# Altium PCB PCB1.PcbDoc (part 2 of 2)
Units mm, origin at the board's own origin, x right, y up, seen from the top; angles counter-clockwise.
Board outline 153 x 70 mm, 4 copper layers (Top Layer, Middle Layer 1, Middle Layer 2, Bottom Layer), stack 0.417 mm thick; 107 components, 120 nets, 560 pads, 392 vias.
Unrouted connection lines stored in the file: 47.
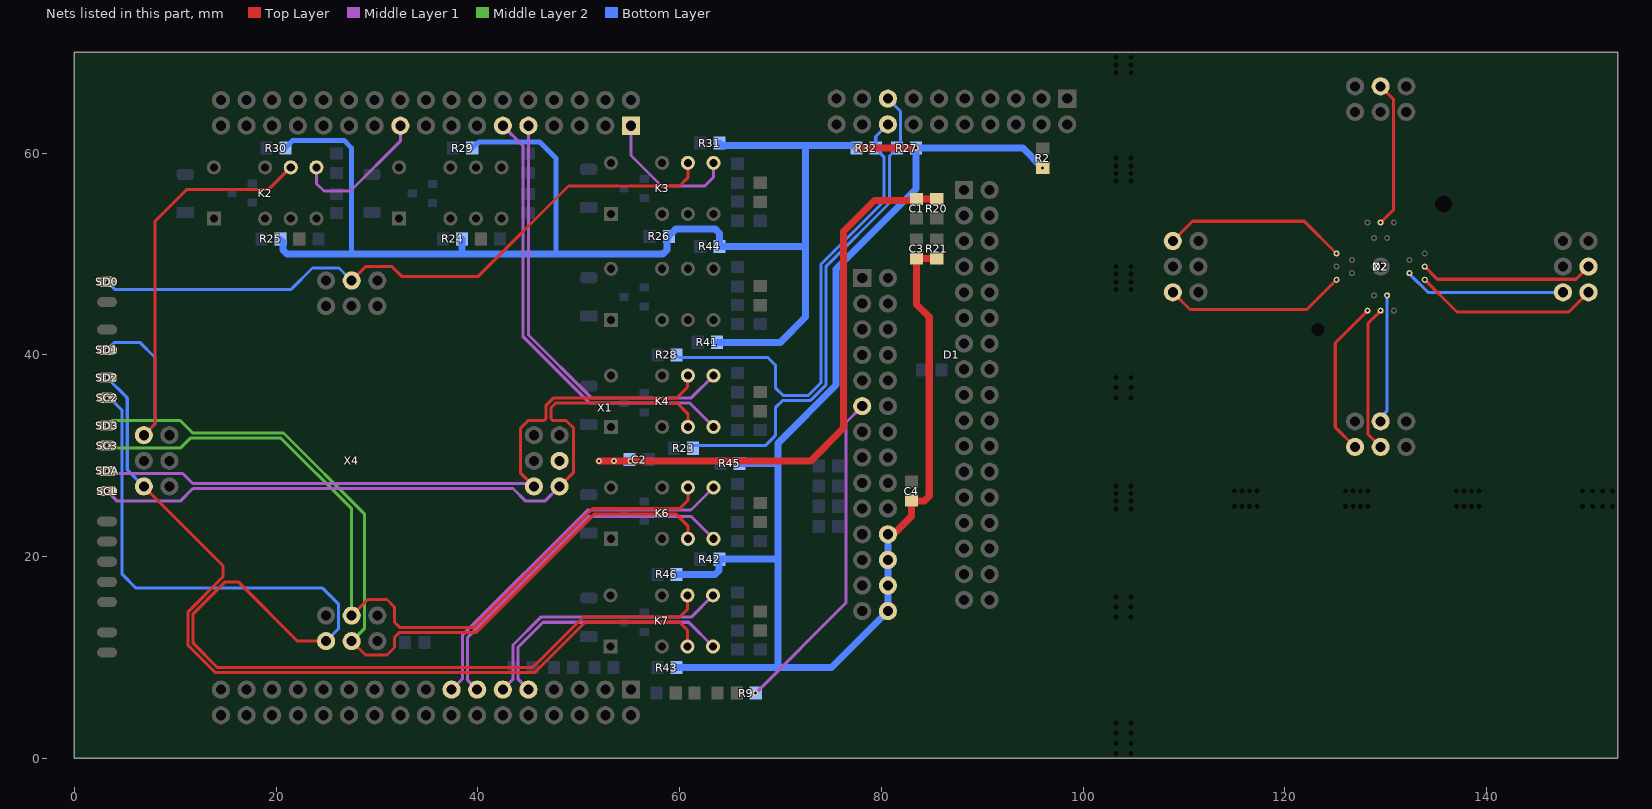
[diagram p4: the nets of this part, all layers, seen from the top]

## Via types
v1: diameter 0.6, hole 0.3, Top Layer to Bottom Layer, tented both sides, 392 vias

## Nets (pads, with @x,y where several pads share a name; then routed paths per layer and width w, separated by ;. In a path a pad name is that pad's centre, name@x,y a point inside that pad or via, vN(x,y) a via of type N, cw(c..) or ccw(c..) an arc to the next point about the centre after c; other vN are vias at no path point) (continued)
SC2_F: K7.8 X1.60 | length 26.7
  Middle Layer 1 w0.3: X1.60@42.48,6.82 43.5,7.84 43.5,11.25 46.25,14 61.15,14 K7.8@63.32,16.17
SC2_KY: D2.11 X2.11 | length 15.6
  Top Layer w0.3: X2.11@126.96,30.875 125,32.835 125,41.18 D2.11@128.2,44.38
SC2_PCA: K7.9 SC2.1 X4.11 | length 118.8
  Top Layer w0.3: X4.11@24.96,11.625 22.125,11.625 16.25,17.5 14.957,17.5 11.75,14.293 11.75,11.457 14.207,9 45.422,9 50.422,14 50.75,14 60,14 60.78,14.78 K7.9@60.78,16.17
  Bottom Layer w0.3: v1(3.25,35.75) 3.307,35.693 3.557,35.693 4.75,34.5 4.75,18.25 6.126,16.874 24.626,16.874 26.21,15.29 26.21,12.875 X4.11@24.96,11.625
SC3_F: K6.8 X1.58 | length 36.8
  Middle Layer 1 w0.3: X1.58@37.4,6.82 38.5,7.92 38.5,12.25 50.882,24.632 61.137,24.632 K6.8@63.36,26.855
SC3_KY: D2.14 X2.14 | length 12.8
  Bottom Layer w0.3: X2.14@129.5,33.415 129.5,33.821 130.15,34.471 D2.14@130.15,45.905
SC3_PCA: K6.9 SC3.1 X4.14 | length 80.7
  Top Layer w0.3: X4.14@27.5,14.165 29.085,15.75 31,15.75 31.75,15 31.75,13.5 32.25,13 39.628,13 51.378,24.75 59.995,24.75 60.82,25.575 K6.9@60.82,26.855
  Middle Layer 2 w0.3: v1(3.25,31) 3.326,31 3.576,30.75 10.5,30.75 11.5,31.75 20.5,31.75 27.5,24.75 X4.14@27.5,14.165
SCL_F: K4.5 X1.6 | length 44.3
  Middle Layer 1 w0.3: X1.6@42.48,62.72 44.5,60.7 44.5,41.793 51.043,35.25 60.978,35.25 K4.5@63.36,32.868
SCL_KY: D2.16 X2.16 | length 18.4
  Top Layer w0.3: D2.16@133.87,47.45 137.07,44.25 148.145,44.25 X2.16@150.105,46.21
SCL_MC: D1.15X2 R23.2 R27.1 | length 49.2
  Bottom Layer w0.3: R23.2@61.348,31 68.5,31 69.5,32 69.5,34.75 70.25,35.5 73,35.5 74.5,37 74.5,48.75 80.811,55.061 80.811,59.711 81.55,60.45 R27.1@81.55,60.5 81.9,60.85 81.9,64.15 D1.15X2@80.65,65.4
SCL_PCA: K4.4 SCL.1 X4.16 | length 72.5
  Top Layer w0.3: X4.16@48.105,26.96 49.5,28.355 49.5,32.75 48.75,33.5 47.426,33.5 47.25,33.676 47.25,34.75 47.75,35.25 59.75,35.25 60.82,34.18 K4.4@60.82,32.868
  Middle Layer 1 w0.3: v1(3.25,26.5) 4.25,25.5 10.5,25.5 11.75,26.75 43.5,26.75 44.75,25.5 46.645,25.5 X4.16@48.105,26.96
SD0_F: K3.8 X1.1 | length 14.2
  Middle Layer 1 w0.3: X1.1@55.18,62.72 55.18,59.777 58.207,56.75 62.5,56.75 63.36,57.61 K3.8@63.36,59.04
SD0_KY: D2.3 X2.3 | length 14.5
  Top Layer w0.3: D2.3@129.5,53.12 130.75,54.37 130.75,65.375 X2.3@129.5,66.625
SD0_PCA: K3.9 SD0.1 X4.3 | length 65.8
  Top Layer w0.3: X4.3@27.5,47.375 28.875,48.75 31.5,48.75 32.5,47.75 40,47.75 49,56.75 60,56.75 60.82,57.57 K3.9@60.82,59.04
  Bottom Layer w0.3: v1(3.25,47.25) 4,46.5 21.5,46.5 23.625,48.625 26.25,48.625 X4.3@27.5,47.375
SD1_F: K2.8 X1.10 | length 13.8
  Middle Layer 1 w0.3: K2.8@24,58.59 24,57 24.75,56.25 27.388,56.25 32.32,61.182 X1.10@32.32,62.72
SD1_KY: D2.6 X2.6 | length 18.4
  Top Layer w0.3: X2.6@108.895,51.29 110.855,53.25 121.93,53.25 D2.6@125.13,50.05
SD1_PCA: K2.9 SD1.1 X4.6 | length 51.2
  Top Layer w0.3: X4.6@6.895,32.04 8,33.145 8,53.25 11.168,56.418 19.288,56.418 K2.9@21.46,58.59
  Bottom Layer w0.3: v1(3.25,40.5) 4,41.25 6.5,41.25 8,39.75 8,33.145 X4.6@6.895,32.04
SD2_F: K7.5 X1.61 | length 26
  Middle Layer 1 w0.3: X1.61@45.02,6.82 44,7.84 44,11.043 46.457,13.5 60.91,13.5 K7.5@63.32,11.09
SD2_KY: D2.10 X2.10 | length 18.2
  Top Layer w0.3: X2.10@108.895,46.21 110.605,44.5 122.18,44.5 D2.10@125.13,47.45
SD2_PCA: K7.4 SD2.1 X4.10 | length 87.4
  Top Layer w0.3: X4.10@6.895,26.96 14.75,19.105 14.75,18 11.25,14.5 11.25,11.25 14,8.5 45.63,8.5 50.63,13.5 60,13.5 60.78,12.72 K7.4@60.78,11.09
  Bottom Layer w0.3: v1(3.25,37.75) 5.25,35.75 5.25,28.605 X4.10@6.895,26.96
SD3_F: K6.5 X1.59 | length 35.8
  Middle Layer 1 w0.3: X1.59@39.94,6.82 39,7.76 39,12 51,24 61.135,24 K6.5@63.36,21.775
SD3_KY: D2.13 X2.13 | length 14.5
  Top Layer w0.3: X2.13@129.5,30.875 128.25,32.125 128.25,43.13 D2.13@129.5,44.38
SD3_PCA: K6.4 SD3.1 X4.13 | length 84.8
  Top Layer w0.3: X4.13@27.5,11.625 28.875,10.25 31,10.25 31.75,11 31.75,12 32.25,12.5 39.835,12.5 51.585,24.25 59.625,24.25 60.82,23.055 K6.4@60.82,21.775
  Middle Layer 2 w0.3: v1(3.25,33) 3.75,33.5 10.5,33.5 11.75,32.25 20.75,32.25 28.79,24.21 28.79,12.915 X4.13@27.5,11.625
SDA_F: K4.8 X1.5 | length 42.6
  Middle Layer 1 w0.3: X1.5@45.02,62.72 45.02,41.98 51.25,35.75 61.163,35.75 K4.8@63.36,37.948
SDA_KY: D2.17 X2.17 | length 16
  Bottom Layer w0.3: D2.17@132.345,48.1 132.345,48.056 134.191,46.21 X2.17@147.565,46.21
SDA_MC: D1.16X2 R28.2 R32.1 | length 46.8
  Bottom Layer w0.3: R28.2@59.7,40 59.95,39.75 68.75,39.75 69.5,39 69.5,36.75 70.25,36 72.793,36 74,37.207 74,48.957 80.25,55.207 80.25,59.65 79.45,60.45 R32.1@79.45,60.5 79.45,61.66 D1.16X2@80.65,62.86
SDA_PCA: K4.9 SDA.1 X4.17 | length 69.4
  Top Layer w0.3: X4.17@45.565,26.96 44.25,28.275 44.25,32.75 45,33.5 46.574,33.5 46.75,33.676 46.75,34.75 46.75,34.957 47.543,35.75 59.75,35.75 60.797,36.798 60.797,37.925 K4.9@60.82,37.948
  Middle Layer 1 w0.3: v1(3.25,28.5) 3.326,28.5 3.576,28.25 10.75,28.25 11.75,27.25 44.639,27.25 44.642,27.247 45.278,27.247 X4.17@45.565,26.96
VCC_MC: C3.1 C4.1 D1.22X3 D1.24X3 D1.26X3 D1.28X3 R2.2 R21.2 R24.2 R25.2 R26.2 R27.2 R29.2 R30.2 R31.2 R32.2 R41.2 R42.2 R43.2 R44.2 R45.2 R46.2 | length 289.5
  Top Layer w0.7: v1(77.55,60.5) v1(83.45,60.5) ; D1.22X3@80.65,22.22 80.86,22.43 81.43,22.43 83,24 C4.1@83,25.55 83.01,25.54 84.29,25.54 84.75,26 84.75,43.75 83.5,45 C3.1@83.5,49.55 R21.2@85.5,49.55
  Bottom Layer w0.5: R30.2@20.95,60.5 20.95,60.55 21.65,61.25 26.75,61.25 27.5,60.5 27.5,50 ; R29.2@39.45,60.5 39.45,60.55 39.7,60.8 39.81,60.8 40.11,61.1 46.15,61.1 47.75,59.5 47.75,50.09
  Bottom Layer w0.7: R25.2@20.45,51.45 20.7,51.2 20.7,50.41 21.11,50 27.5,50 38.45,50 ; R24.2@38.45,51.5 38.45,50 ; R26.2@58.95,51.75 58.75,51.55 58.75,50.41 58.34,50 38.45,50 ; R26.2@59.2,52.05 59.65,52.5 63.5,52.5 63.96,52.04 63.96,50.76 R44.2@63.95,50.75 72.5,50.75 ; R43.2@59.7,9 69.75,9 ; R46.2@59.7,18.25 63.5,18.25 63.893,18.643 63.893,19.75 R42.2@63.95,19.75 69.75,19.75 ; R41.2@63.7,41.25 70,41.25 72.5,43.75 72.5,50.75 ; R31.2@63.95,61 64.2,60.75 72.5,60.75 ; R45.2@65.95,29.25 69.75,29.25 ; v1(77.55,60.5) 77.505,60.545 ccw(c77.01,60.05) 77.01,60.75 72.5,60.75 ; D1.22X3@80.65,22.22 D1.24X3@80.65,19.68 D1.26X3@80.65,17.14 D1.28X3@80.65,14.6 75.05,9 69.75,9 ; v1(96,58.55) 94.05,60.5 v1(83.45,60.5) 83.45,56.45 75.5,48.5 75.5,37 69.75,31.25 69.75,29.25 ; 69.75,9 69.75,19.75 ; 69.75,19.75 69.75,29.25 ; 72.5,50.75 72.5,60.75
VDD_KY: D2.18 X2.18 | length 17.3
  Top Layer w0.3: D2.18@133.87,48.754 135.124,47.5 148.855,47.5 X2.18@150.105,48.75
VDD_PCA: C1.1 C2.1 R20.2 X4.18 | length 55.6
  Top Layer w0.7: v1(52,29.5) v1(53.5,29.5) 55,29.5 73,29.5 76.25,32.75 76.25,52.25 79.308,55.308 83.308,55.308 C1.1@83.45,55.45 ; C1.1@83.5,55.45 R20.2@85.5,55.45
  other v1: 55.154,29.498
WRITE: D1.11X3 R9.1 | length 32.8
  Middle Layer 1 w0.3: v1(67.55,6.47) 76.5,15.42 76.5,33.31 D1.11X3@78.11,34.92
pads on no net: D1.1X3 D1.2X3 D1.3X3 D1.4X3 D1.6X2 D1.6X3 D1.7X3 D1.8X2 D1.8X3 D1.9X2 D1.10X2 D1.10X3 D1.11X2 D1.12X2 D1.12X3 D1.13X2 D1.13X3 D1.14X2 D1.14X3 D1.15X3 D1.16X3 D1.17X2 D1.18X2 D1.19X2 D1.20X2 D2.0 X1.11 X1.12 X1.13 X1.14 X1.15 X1.16 X1.17 X1.18 X1.19 X1.20 X1.21 X1.22 X1.23 X1.24 X1.25 X1.26 X1.27 X1.28 X1.29 X1.30 X1.31 X1.32 X1.33 X1.34 X1.35 X1.36 X1.37 X1.38 X1.39 X1.40 X1.41 X1.42 X1.43 X1.44 X1.45 X1.46 X1.47 X1.48 X1.49 X1.50 X1.51 X1.52 X1.53 X1.54 X1.55 X1.56 X1.57 X1.+12V X1.-12V X1.IN-OUT2 X1.IN-OUT3 X1.IN-OUT4 X1.IN-OUT5 X1.IN-OUT6 X1.IN-OUT7 X1.IN-OUT8 X1.NC X1.OUT4 X1.OUT5 X1.OUT6 X1.OUT7 X1.OUT8 X1.VDDF X1.VDDS X1.VEEF X1.VEES

## Polygon pours and split planes (outlines as drawn)
EP_KY on Top Layer "NONET_L-01_P-001" (solid, remove dead copper, pour order 0): 107,68.75 107,28.75 152,28.75 152,68.75
GND on Top Layer "NONET_L-01_P-001" (solid, remove dead copper, pour order 2): 1,69 101,69 101,1 1,1
VDD_PCA on Bottom Layer "NONET_L-01_P-001" (solid, remove dead copper, pour order 1): 47.75,31.25 55.5,31.25 56,30.75 56,28.5 55.5,28 49.214,28 47.25,28 47.25,30.75
GND on Bottom Layer "NONET_L-01_P-001" (solid, remove dead copper, pour order 8): 1,69 1,1 101,1 101,69
EP_KY on Bottom Layer "NONET_L-01_P-001" (solid, remove dead copper, pour order 5): 107,68.75 107,28.75 152,28.75 152,68.75
EP_KY on Middle Layer 1 "NONET_L-01_P-001" (solid, remove dead copper, pour order 6): 107,68.75 107,28.75 152,28.75 152,68.75
GND on Middle Layer 1 "NONET_L-01_P-001" (solid, remove dead copper, pour order 3): 1,69 1,1 101,1 101,69
EP_KY on Middle Layer 2 "NONET_L-01_P-001" (solid, remove dead copper, pour order 7): 107,68.75 107,28.75 152,28.75 152,68.75
GND on Middle Layer 2 "NONET_L-01_P-001" (solid, remove dead copper, pour order 4): 1,69 1,1 101,1 101,69

## Other copper
Top Layer:
  pour cut-out: 68.85,45.72 68.85,42.49 67.553,42.49
  pour cut-out: 67.793,45.72 65.525,45.72 65.525,45.029
  pour cut-out: 5.809,29.661 5.061,29.661 5.061,30.034
  pour cut-out: 133.149,30.875 133.149,32.698 134.33,32.698
  pour cut-out: 125.851,30.875 125.851,32.698 124.67,32.698
  pour cut-out: 128.5,36.5 128.5,32.335 134,32.335 134,34.75
  pour cut-out: 126.96,29.766 132.04,29.766 132.04,30.875
  pour cut-out: 130.66,45.905 130.66,44.376 131.309,44.376
  pour cut-out: 128.34,45.905 128.34,44.376 127.691,44.376
  pour cut-out: 128.85,46.415 130.15,46.415 130.15,45.905
  pour cut-out: 150.105,45.101 148.282,45.101 148.282,43.92
  pour cut-out: 150.105,52.399 148.397,52.399 148.397,53.502
  pour cut-out: 144.75,53.25 148.5,53.25 148.5,49.75 145,49.75
  pour cut-out: 151.214,51.29 151.214,46.21 150.105,46.21
  pour cut-out: 131.835,49.4 131.835,48.078 132.345,48.078
  pour cut-out: 132.345,47.59 133.87,47.59 133.87,46.94
  pour cut-out: 132.345,49.91 133.874,49.91 133.874,50.559
  pour cut-out: 130.66,51.595 130.66,53.12 131.31,53.12
  pour cut-out: 128.85,51.085 130.172,51.085 130.172,51.595
  pour cut-out: 127.84,52.76 128.379,52.76 128.379,51.4
  pour cut-out: 125.415,65.221 125,62.75 130.75,62.75 130.75,65.375
  pour cut-out: 126.96,67.734 132.04,67.734 132.04,66.625
  pour cut-out: 108.895,45.101 110.468,45.101 110.468,44.17
  pour cut-out: 108.895,52.399 110.603,52.399 110.603,53.502
  pour cut-out: 109.75,50 113.25,50 113.25,44.75 110.355,44.75
  pour cut-out: 127.031,47.75 125.126,47.75 125.126,46.941
  pour cut-out: 127.165,49.4 127.165,48.1 126.655,48.1
  pour cut-out: 125.13,50.56 125.13,49.75 127.03,49.75
  pour cut-out: 111.435,47.641 108.895,47.641 108.895,48.75
  pour cut-out: 110.004,46.21 110.004,48.75 108.895,48.75
  pour cut-out: 112.544,48.75 112.544,50 111.75,50
  pour cut-out: 107.786,51.29 107.786,46.21 108.895,46.21
  pour cut-out: 90.74,54.929 85.5,54.929 85.5,53.55
  pour cut-out: 7.975,29.649 9.432,29.649 9.432,30.772
  pour cut-out: 9.435,33.149 5.786,33.149 5.786,30.75 10.544,30.75 10.544,32.04
  pour cut-out: 24.96,15.274 31.75,15.274 31.75,10.516 24.96,10.516
  pour cut-out: 23.97,14.65 23.97,11.982 22.273,11.982
  pour cut-out: 84.65,52.25 86.35,52.25 86.35,48.75 84.65,48.75
  pour cut-out: 84.65,52.75 86.35,52.75 86.35,56.25 84.65,56.25
  pour cut-out: 95.15,59.65 95.15,59.35 96.85,59.35 96.85,59.65
  pour cut-out: 86.35,54.107 86.35,51.28 91.812,51.28 91.812,54.107
  pour cut-out: 87.091,45.267 83.5,45.267 83.5,44.75
  pour cut-out: 88.2,47.309 90.74,47.309 90.74,46.2
  pour cut-out: 91.849,46.2 91.849,43.66 90.74,43.66
  pour cut-out: 88.2,19.691 85.5,19.691 85.5,20.5
  pour cut-out: 91.849,43.66 91.849,19.75 87.091,19.75 87.091,44.93
  pour cut-out: 87.091,46.2 87.091,43.66 88.2,43.66
  pour cut-out: 80.65,25.869 82.911,25.869 82.911,25.461
  pour cut-out: 77.001,24.76 77.001,22.22 78.11,22.22
  pour cut-out: 78.11,25.869 80.65,25.869 80.65,24.76
  pour cut-out: 82.142,15.638 80.65,15.638 80.65,14.6
  pour cut-out: 79.207,14.757 80.699,14.757 80.699,15.28
  pour cut-out: 77.001,22.22 77.001,17.14 78.11,17.14
  pour cut-out: 45.565,25.851 48.105,25.851 48.105,26.96
  pour cut-out: 45,33.5 48.105,33.5 48.105,26.96 45.565,26.96
  pour cut-out: 72.89,33.301 72.89,32.585 71.228,32.585
  pour cut-out: 74.496,34.509 76.25,34.509 76.25,33.75
  pour cut-out: 70.303,30.687 70.303,29.5 70.813,29.5
  pour cut-out: 31.112,44.548 31.112,46.893 32.648,46.893
  pour cut-out: 28.592,42.92 30.04,42.92 30.04,44.835
  pour cut-out: 28.875,48.75 26.25,48.75 26.25,48.25
  pour cut-out: 25.109,45.854 25.109,47.5 25.828,47.5
Middle Layer 1:
  pour cut-out: 39.357,7.908 45.02,7.908 45.02,6.82
  pour cut-out: 39.94,5.711 42.48,5.711 42.48,6.82
  pour cut-out: 53.2,58.132 56,58.132 56,59
  pour cut-out: 52.296,59.04 52.296,62.25 53,62.25
  pour cut-out: 5.75,30.75 8,30.75 8,28.25 5.75,28.25
  pour cut-out: 95.89,63.969 93.35,63.969 93.35,61.751 93.328,60.252
  pour cut-out: 50.1,63.829 52.64,63.829 52.704,61.546 49.028,61.546
  pour cut-out: 45.02,63.829 47.56,63.829 47.56,62.72
  pour cut-out: 48.143,61.632 45.377,61.677 45.02,62.72
  pour cut-out: 32.2,57.682 38.679,57.682 37.4,63.829 34.86,63.829
  pour cut-out: 132.345,47.59 133.87,46.94 134.38,47.45 134.38,50.05 133.87,50.56 132.345,49.91 131.835,49.4 131.835,48.1
  pour cut-out: 128.85,46.415 130.15,46.415 130.66,45.905 131.271,44.575 131.31,44.38 130.8,43.87 128.2,43.87 127.729,44.575 128.379,46.1
  pour cut-out: 125.13,50.56 126.655,49.91 127.165,49.4 127.165,48.1 126.655,47.59 125.13,46.94 124.62,47.45 124.62,50.05
  pour cut-out: 127.69,53.12 128.34,51.595 128.85,51.085 130.15,51.085 130.66,51.595 131.31,53.12 130.8,53.63 128.2,53.63
  pour cut-out: 4.25,25.143 1.75,25.143 1.75,28.75
  pour cut-out: 10.544,32.04 10.544,29.5 9.435,29.5
  pour cut-out: 6.895,33.149 9.435,33.149 9.435,32.04
  pour cut-out: 5.613,31.08 6.895,31.08 6.895,32.04
  pour cut-out: 32.2,57.682 29.854,57.682 29.854,58.716
  pour cut-out: 33.108,58.59 33.108,62.72 32.32,62.72
  pour cut-out: 32.32,63.829 34.86,63.829 34.86,62.72
  pour cut-out: 36.291,62.72 36.291,58.59 37.28,58.59
  pour cut-out: 42.36,52.602 44.75,52.602 44.75,54.25
  pour cut-out: 37.4,63.829 39.94,63.829 39.94,62.72
  pour cut-out: 39.94,63.829 42.48,63.829 42.48,62.72
  pour cut-out: 42.48,63.829 45.02,63.829 45.02,62.72
  pour cut-out: 47.56,63.829 50.1,63.829 50.1,62.72
  pour cut-out: 52.64,63.829 55.18,63.829 55.18,62.72
  pour cut-out: 45.565,28.069 48.105,28.069 48.105,26.96
  pour cut-out: 37.4,5.711 39.94,5.711 39.94,6.82
  pour cut-out: 42.48,5.711 45.02,5.711 45.02,6.82
  pour cut-out: 67.04,6.47 67.04,7.75 67.5,7.75
  pour cut-out: 79.219,37.46 79.219,34.92 78.11,34.92
Middle Layer 2:
  pour cut-out: 88.2,19.369 90.74,19.369 90.74,18.26
  pour cut-out: 3.25,44.74 2,44.74 2,45.25
  pour cut-out: 3.76,45.25 3.76,46.25 3,46.25
  pour cut-out: 54.06,11.99 54.06,9 53,9
  pour cut-out: 55.154,30.008 51,30.008 51,28.988 55.154,28.988
  pour cut-out: 7.989,29.654 9.382,29.654 9.382,32.067
  pour cut-out: 28.79,10.018 29.868,10.447 29.868,13.124 24.96,15.274 23.851,14.165 23.851,11.625 23.851,10.271
  pour cut-out: 24.96,15.274 29.844,15.312 29.844,13.049
  pour cut-out: 125.13,50.56 126.655,49.91 127.165,49.4 127.165,48.1 126.655,47.59 125.13,46.94 124.62,47.45 124.62,50.05
  pour cut-out: 128.85,46.415 130.15,46.415 130.66,45.905 131.31,44.38 130.8,43.87 128.2,43.87 127.69,44.38 128.34,45.905
  pour cut-out: 132.345,49.91 133.87,50.56 134.38,50.05 134.38,47.45 133.87,46.94 132.345,47.59 131.835,48.1 131.835,49.4
  pour cut-out: 128.2,53.63 130.8,53.63 131.31,53.12 130.66,51.595 130.15,51.085 128.85,51.085 128.34,51.595 127.69,53.12
  pour cut-out: 88.2,14.611 85,14.611 85,15.5
  pour cut-out: 90.74,14.611 88.2,14.611 88.2,15.72
  pour cut-out: 91.849,18.26 91.849,15.72 90.74,15.72
  pour cut-out: 2.74,33 2.74,31 3.25,31
Bottom Layer:
  pour cut-out: 64.268,26.855 64.268,29.5 62.75,29.5
  pour cut-out: 42.84,52.233 44.25,52.233 44.25,53.328
  pour cut-out: 59.148,11.09 59.148,9 57.8,9
  pour cut-out: 88.2,39.689 83.25,39.689 83.25,37.471
  pour cut-out: 88.2,37.471 83.25,37.471 83.25,39.35
  pour cut-out: 81.759,22.22 81.759,14.6 80.65,14.6
  pour cut-out: 57.372,48.54 57.372,50 58.34,50
  pour cut-out: 58.648,31.6 58.648,32.868 57.372,32.868
  pour cut-out: 59.148,16.17 59.148,18.25 57.8,18.25
  pour cut-out: 60,30.625 60,28.875 61.782,28.875
  pour cut-out: 26.164,60.515 26.164,58.765 26.914,58.765
  pour cut-out: 69.143,36.75 69.143,34.75 69.5,34.75
  pour cut-out: 64.9,37.1 66.581,37.1 66.581,32.234
  pour cut-out: 63.36,22.683 65.75,22.683 65.75,21.55
  pour cut-out: 68.689,24.25 65.75,24.25 65.75,23.45
  pour cut-out: 64.9,26.1 66.6,26.1 66.6,20.311 64.75,20.311
  pour cut-out: 62.483,22.01 62.483,19.693 63.893,19.693
  pour cut-out: 42.759,9.85 42.48,9.85 42.48,6.722
  pour cut-out: 42.48,5.711 45.02,5.711 45.02,6.82
  pour cut-out: 45.02,5.711 47.56,5.711 47.56,6.82
  pour cut-out: 42.75,9.85 42.75,8.15 45.745,8.15
  pour cut-out: 55.85,56.844 55.85,55.884 57.17,55.884
  pour cut-out: 57.372,26.855 57.372,25.5 64.268,25.5 64.268,26.855
  pour cut-out: 68.85,46.13 64.65,46.13 64.65,41.75 68.85,41.75
  pour cut-out: 59.188,37.948 59.188,40 57.8,40
  pour cut-out: 63.25,30.1 66.75,30.1 66.75,28.541 63.25,28.541
  pour cut-out: 58.648,31.6 62.148,31.6 62.148,29.9 58.648,29.9
  pour cut-out: 126.96,32.306 129.5,32.306 129.5,33.618
  pour cut-out: 128.85,46.415 130.15,46.415 130.66,45.905 131.31,44.38 130.8,43.87 128.2,43.87
  pour cut-out: 148.674,48.75 148.674,46.21 147.565,46.21
  pour cut-out: 133.87,50.56 134.38,50.05 134.38,47.45 133.87,47.45
  pour cut-out: 133.87,50.56 132.345,49.91 131.835,49.4 131.835,48.1 132.296,47.6 133.87,47.45
  pour cut-out: 129.5,65.194 132.04,65.194 132.04,64.085
  pour cut-out: 127.69,53.12 128.379,51.4 128.85,51.085 130.15,51.085 130.65,51.546 130.8,53.12
  pour cut-out: 127.165,49.4 127.165,48.1 126.655,47.59 125.13,46.94 124.62,47.45 124.62,50.05
  pour cut-out: 110.326,51.29 110.326,48.75 111.435,48.75
  pour cut-out: 80.65,41.431 84.05,41.431 84.05,41.45
  pour cut-out: 81.759,45.08 81.759,42.54 80.65,42.54
  pour cut-out: 78.11,46.189 80.65,46.189 80.65,45.08
  pour cut-out: 77.001,45.08 77.001,42.54 78.11,42.54
  pour cut-out: 78.11,41.431 80.65,41.431 80.65,42.54
  pour cut-out: 83.25,39.35 86.75,39.35 86.75,37.65 83.25,37.65
  pour cut-out: 84.25,61.311 84.25,62.86 83.19,62.86
  pour cut-out: 76.75,61.311 84.25,61.311 84.25,59.65 76.75,59.65
  pour cut-out: 84.299,65.4 84.299,62.86 83.19,62.86
  pour cut-out: 80.65,66.509 83.19,66.509 83.19,65.4
  pour cut-out: 79.541,65.4 79.541,62.86 80.65,62.86
  pour cut-out: 21.352,49.439 31,49.439 31,43.585 23.665,43.585
  pour cut-out: 31.112,47.662 31.112,50 28.75,50
  pour cut-out: 30.04,43.75 33.25,43.75 33.25,44.5
  pour cut-out: 27.5,43.726 30.04,43.726 30.04,44.835
  pour cut-out: 21.352,46.857 21.352,50 24.305,50
  pour cut-out: 2.74,47.25 2.74,45.25 3.25,45.25
  pour cut-out: 2.74,37.75 2.74,35.75 3.25,35.75
  pour cut-out: 2.74,42.5 2.74,40.5 3.25,40.5
  pour cut-out: 6.895,33.149 5.25,33.149 5.25,32
  pour cut-out: 6.712,32.043 6.72,29.585 6.712,27.128 5.067,27.128
  pour cut-out: 9.435,30.931 6.895,30.931 6.895,32.04
  pour cut-out: 23.851,13.808 23.851,16.874 24.019,16.874
  pour cut-out: 27.5,15.274 24.96,15.274 24.96,14.165
  pour cut-out: 23.851,11.625 23.851,14.165 24.96,14.165
  pour cut-out: 28.609,14.165 28.609,11.625 27.5,11.625
  pour cut-out: 24.96,10.516 27.5,10.516 27.5,11.625
  pour cut-out: 32,12.35 32,10.65 35.5,10.65 35.5,12.35
  pour cut-out: 56.28,7.92 54.25,7.92 54.25,9.85
  pour cut-out: 52.64,5.711 55.18,5.711 55.18,6.82
  pour cut-out: 54.25,9.85 54.25,8.15 50.73,8.15 50.73,9.835
  pour cut-out: 47.56,5.711 52.64,5.711 52.64,6.82
  pour cut-out: 64.85,7.32 68.35,7.32 68.35,5.62 64.85,5.62
  pour cut-out: 56.93,7.32 60.43,7.32 60.43,5.62 56.93,5.62
  pour cut-out: 57,9.85 60.5,9.85 60.5,8.15 57,8.15
  pour cut-out: 66.71,13.63 69.25,13.63 69.25,10.13 66.71,10.13
  pour cut-out: 64.9,15.3 66.7,15.3 66.7,9.5 64.9,9.5
  pour cut-out: 74.971,34.195 74.971,35.75 74,35.75
  pour cut-out: 73.354,22.15 69.25,22.15 69.25,24.585
  pour cut-out: 73,29.85 78.11,29.85 78.11,22.15 73,22.15
  pour cut-out: 77.001,29.84 77.001,22.22 78.11,22.22
  pour cut-out: 78.11,30.949 80.65,30.949 80.65,29.84
  pour cut-out: 81.759,22.22 81.759,29.84 80.65,29.84
  pour cut-out: 77.001,22.22 77.001,17.14 78.11,17.14
  pour cut-out: 78.11,21.111 80.65,21.111 80.65,22.22
  pour cut-out: 78.272,15.765 78.272,13 79.25,13
  pour cut-out: 78.272,15.765 78.272,17.158 80.685,17.158
  pour cut-out: 67.15,24.25 67.15,20.75 69.25,20.75 69.25,24.25
  pour cut-out: 64.65,25.85 64.65,20.75 66.35,20.75 66.35,25.85
  pour cut-out: 61.25,20.6 64.75,20.6 64.75,18.9
  pour cut-out: 57.403,22.01 57.403,17.4 60.5,17.4
  pour cut-out: 54.068,16.17 54.068,13.25 53,13.25
  pour cut-out: 54.108,25.1 54.108,28 52.357,28
  pour cut-out: 50.425,25.391 46.75,25.391 46.75,27
  pour cut-out: 54.108,26.855 54.108,24.5 53.25,24.5
  pour cut-out: 45.565,25.851 43.75,25.851 43.75,27
  pour cut-out: 48.105,25.851 45.565,25.851 45.565,26.96
  pour cut-out: 45.565,30.609 43.5,30.609 43.5,29.75
  pour cut-out: 66.187,35.25 69.5,35.25 69.5,31.832
  pour cut-out: 54.108,48.54 54.108,50 53,50
  pour cut-out: 50.958,48.409 50.958,50 51.75,50
  pour cut-out: 54.108,48.54 54.108,45.75 52.95,45.75
  pour cut-out: 54.108,37.948 54.108,35.5 53.25,35.5
  pour cut-out: 69.857,39 69.857,41.25 68.25,41.25
  pour cut-out: 64.65,36.659 64.65,31 66.35,31
  pour cut-out: 57,40.85 60.5,40.85 60.5,39.15 57,39.15
  pour cut-out: 61,42.1 61,40.4 64.62,40.4 64.62,42.13
  pour cut-out: 67.15,46.13 67.15,42.63 68.85,42.63 68.85,46.13
  pour cut-out: 64.65,47.6 64.65,42.25 66.35,42.25 66.35,47.6
  pour cut-out: 64.75,49.9 60.25,49.9 60.25,52.086
  pour cut-out: 63.36,54.868 65.5,54.868 65.5,53.55
  pour cut-out: 66.47,53.486 66.47,50.76 63.228,50.76
  pour cut-out: 58.28,54.868 63.36,54.868 63.36,53.96
  pour cut-out: 56.25,52.6 56.25,49.75 58,49.75
  pour cut-out: 66.35,56.25 68.85,56.25 68.85,52.5 66.35,52.5
  pour cut-out: 64.65,57.85 66.35,57.85 66.35,52.75 64.65,52.75
  pour cut-out: 61.25,61.85 64.75,61.85 64.75,60.13 61.13,60.13
  pour cut-out: 54.108,59.04 54.108,56.5 53.6,56.5
  pour cut-out: 42.991,52.35 35.75,52.35 35.75,50.548 43.044,50.548
  pour cut-out: 44.15,58.85 45.85,58.85 45.85,53.25 44.15,53.25
  pour cut-out: 36.291,62.72 36.291,60.5 37.55,60.5
  pour cut-out: 46.092,63.007 46.092,61 45.25,61
  pour cut-out: 37.4,63.829 45.02,63.829 45.02,62.72
  pour cut-out: 36.75,61.35 40.25,61.35 40.25,59.68 36.75,59.68
  pour cut-out: 34.85,56.864 34.85,55.5 36.294,55.5
  pour cut-out: 33.108,58.59 33.108,56 32.25,56
  pour cut-out: 16.99,56.484 16.99,55.5 17.821,55.5
  pour cut-out: 14.748,58.59 14.748,56.05 13.65,56.05
  pour cut-out: 23.765,54.387 26,54.387 26,54.05
  pour cut-out: 23.092,53.51 23.092,51.5 24.191,51.5
  pour cut-out: 19.828,53.51 19.828,51.5 18.55,51.5
  pour cut-out: 17.75,52.35 17.75,50.5 25.111,50.5 25.111,52.42
  pour cut-out: 25.15,56.75 26.85,56.75 26.85,53.25 25.15,53.25
  pour cut-out: 27.959,60.336 27.959,62.72 27.24,62.72
  pour cut-out: 22.16,63.829 27.24,63.829 27.24,62.72
  pour cut-out: 18.511,62.72 18.511,60.5 20,60.5
  pour cut-out: 19.62,63.829 22.16,63.829 22.16,62.72
  pour cut-out: 18.25,61.35 18.25,59.68 21.87,59.68 21.87,61.39

## Silkscreen, mask and mechanical layers (free items; w line width, h text height)
Top Overlay:
  rectangle: 5,25.25 11,33.75
  rectangle: 31.07,61.39 56.47,63.93
  rectangle: 36.03,5.53 53.81,8.07
  region: 5,15.75 5,9.5 10.25,9.5
  region: 107,35 107,28.75 112.25,28.75
  region: 13.25,30.25 13.25,29.25 14,29.75
  lines w0.2: 12.25,29.75 14,29.75 ; 24.75,27.925 25.25,27.925 ; 24.75,28.725 25.25,28.725 ; 24.75,29.525 25.25,29.525 ; 24.75,30.325 25.25,30.325 ; 24.75,31.125 25.25,31.125 ; 26.05,26.625 26.05,27.125 ; 26.05,32.125 26.05,32.625 ; 26.85,26.625 26.85,27.125 ; 26.85,32.125 26.85,32.625 ; 27.65,26.625 27.65,27.125 ; 27.65,32.125 27.65,32.625 ; 28.45,26.625 28.45,27.125 ; 28.45,32.125 28.45,32.625 ; 29.25,26.625 29.25,27.125 ; 29.25,32.625 29.25,32.125 ; 30.25,27.925 30.75,27.925 ; 30.25,28.725 30.75,28.725 ; 30.25,29.525 30.75,29.525 ; 30.25,30.325 30.75,30.325 ; 30.75,31.125 30.25,31.125 ; 14,29.75 13.25,30.25 13.25,29.25 14,29.75 ; 29.25,32.125 29.5,31.875 29.5,31.5 29.875,31.5 30.25,31.125 ; 29.25,32.125 25.75,32.125 25.25,31.625 25.25,27.625 25.75,27.125 29.75,27.125 30.25,27.625 30.25,28.625 ; 30.25,28.625 30.25,30 ; 30.25,28.625 30.25,30 ; 30.25,30 30.25,31.125
  text "SD1" at 32.217,66.831 h0.6 r45
  text "SCL" at 42.397,66.76 h0.6 r45
  text "SC0" at 52.647,66.76 h0.6 r45
  text "SD0" at 55.147,66.76 h0.6 r45
  text "INT1" at 39.791,66.654 h0.6 r45
  text "SC1" at 34.47,66.584 h0.6 r45
  text "INT0" at 37.22,66.584 h0.6 r45
  text "SDA" at 44.72,66.584 h0.6 r45
  text "INT3" at 47.22,66.584 h0.6 r45
  text "INT2" at 49.97,66.584 h0.6 r45
  text "SD1 & SC1 FK/VCC" at 12.1,52.814 h0.6 r90
  text "INT0 & INT1 FK/VCC" at 30.6,52.78 h0.6 r90
  text "SD0 & SC0 FK/VCC" at 54.504,51.505 h0.6
  text "I2C 4-CHANNEL MULTIPLEXER" at 6,44.774 h3
  text "INT2 & INT3 FK/VCC" at 54.06,41 h0.6
  text "B______" at 146.871,39.003 h5 r270
  text "Положение микросхемы" at 10.813,37.755 h2 r270
  text "INT1" at 26.7,32.925 h0.6 r90
  text "SC0" at 27.7,32.925 h0.6 r90
  text "SD0" at 28.7,32.925 h0.6 r90
  text "INT0" at 29.7,32.925 h0.6 r90
  text "A2" at 30.7,32.925 h0.6 r90
  text "SD1" at 21.75,30.675 h0.6
  text "A1" at 31.05,30.675 h0.6
  text "SDA & SCL FK/VCC" at 54.515,30.5 h0.6
  text "SC1" at 21.55,29.675 h0.6
  text "A0" at 31.05,29.675 h0.6
  text "VSS" at 22.55,29.175 h0.6
  text "VDD" at 31.05,29.175 h0.6
  text "EP" at 27.1,29.05 h0.6
  text "INT2" at 21.05,27.675 h0.6
  text "SDA" at 31.05,27.675 h0.6
  text "SD2" at 21.55,26.675 h0.6
  text "SCL" at 31.05,26.675 h0.6
  text "SC2" at 24.8,26.275 h0.6 r270
  text "INT3" at 25.8,26.275 h0.6 r270
  text "SD3" at 26.8,26.275 h0.6 r270
  text "SC3" at 27.8,26.275 h0.6 r270
  text "INT" at 28.8,26.275 h0.6 r270
  text "M1-SPI-ATM64(V2)" at 96.02,22.085 h4 r90
  text "SD3 & SC3 FK/VCC" at 54.588,19.5 h0.6
  text "SD2 & SC2 FK/VCC" at 54.588,8.75 h0.6
  text "PCA9544A" at 75.882,6.348 h5
  text "ИЛ1418ТО1/1" at 75.342,2.848 h5
  text "A1" at 52.559,1.293 h0.6 r45
  text "A2" at 47.238,1.222 h0.6 r45
  text "A0" at 49.988,1.222 h0.6 r45
  text "SC3" at 36.776,1.01 h0.6 r45
  text "SD3" at 39.276,1.01 h0.6 r45
  text "SC2" at 42.026,1.01 h0.6 r45
  text "SD2" at 44.526,1.01 h0.6 r45
Bottom Overlay:
  text "PCA9544A" at 98.118,6.306 h5
  text "ИЛ1418ТО1/1" at 98.158,2.806 h5
Board:
  lines w0.2: 105.001,4.75 cw(c104.001,5.092) 103.001,4.75 103.001,12.517 cw(c103.948,12.463) 104.001,13.409 cw(c103.993,12.417) 104.985,12.409 105.01,4.75 ; 148.303,26.783 cw(c147.961,25.783) 148.303,24.783 140.536,24.783 cw(c140.59,25.73) 139.644,25.783 cw(c140.636,25.775) 140.644,26.767 148.303,26.792 ; 0,0 153,0 153,70 0,70 0,0 ; 103,50.22 ccw(c103.989,50.22) 103.989,49.231 ccw(c103.989,50.244) 105.002,50.244 104.984,55.75 ccw(c103.992,55.758) 104,56.75 ccw(c103.946,55.804) 103,55.858 103,50.22 ; 103,60.715 ccw(c103.734,60.715) 103.734,59.981 104.268,60 ccw(c104.268,60.715) 104.983,60.715 104.983,66.75 ccw(c104.233,66.75) 104.233,67.5 103.75,67.5 ccw(c103.75,66.75) 103,66.75 103,60.715 ; 103.001,17.374 ccw(c103.735,17.374) 103.735,16.64 104.27,16.659 ccw(c104.27,17.374) 104.985,17.374 104.985,23.409 ccw(c104.235,23.409) 104.235,24.159 103.751,24.159 ccw(c103.751,23.409) 103.001,23.409 103.001,17.374 ; 103.001,28.629 ccw(c103.99,28.629) 103.99,27.64 ccw(c103.99,28.653) 105.003,28.653 104.985,34.159 ccw(c103.993,34.167) 104.001,35.159 ccw(c103.948,34.213) 103.001,34.267 103.001,28.629 ; 103.001,39.124 ccw(c103.735,39.124) 103.735,38.39 104.27,38.409 ccw(c104.27,39.124) 104.985,39.124 104.985,45.159 ccw(c104.235,45.159) 104.235,45.909 103.751,45.909 ccw(c103.751,45.159) 103.001,45.159 103.001,39.124 ; 107.042,25.699 ccw(c107.988,25.645) 107.935,24.699 113.572,24.699 ccw(c113.572,25.688) 114.561,25.688 ccw(c113.548,25.688) 113.548,26.701 108.042,26.683 ccw(c108.034,25.691) 107.042,25.699 ; 117.894,25.783 cw(c118.886,25.775) 118.894,26.767 124.4,26.785 cw(c124.4,25.772) 125.413,25.772 cw(c124.424,25.772) 124.424,24.783 118.786,24.783 cw(c118.84,25.73) 117.894,25.783 ; 128.894,25.533 ccw(c129.644,25.533) 129.644,24.783 135.679,24.783 ccw(c135.679,25.517) 136.413,25.517 136.394,26.052 ccw(c135.679,26.052) 135.679,26.767 129.644,26.767 ccw(c129.644,26.017) 128.894,26.017 128.894,25.533

## Dimensions
113.435,35.415 to 145.565,35.415 on Dimension
145.565,62.085 to 145.565,35.415 on Dimension
132.345,48.1 to 133.87,47.45 on Dimension
135.725,54.975 to 123.275,42.525 on Dimension
130.8,53.12 to 130.8,44.38 on Dimension
128.2,53.12 to 130.8,53.12 on Dimension
153,0 to 153,70 on Dimension
0,0 to 153,0 on Dimension

## Text inside footprints (layer, text, board x,y; h text height)
K1: Bottom Overlay "+" at 33.28,52.85 h2; Bottom Overlay "-" at 33.43,58.16 h2
K2: Bottom Overlay "+" at 14.92,52.85 h2; Bottom Overlay "-" at 15.07,58.16 h2
K3: Bottom Overlay "+" at 54.28,53.3 h2; Bottom Overlay "-" at 54.43,58.61 h2
K4: Bottom Overlay "+" at 54.28,32.207 h2; Bottom Overlay "-" at 54.43,37.518 h2
K5: Bottom Overlay "-" at 54.43,48.11 h2; Bottom Overlay "+" at 54.28,42.8 h2
K6: Bottom Overlay "+" at 54.28,21.115 h2; Bottom Overlay "-" at 54.43,26.425 h2
K7: Bottom Overlay "+" at 54.24,10.43 h2; Bottom Overlay "-" at 54.39,15.74 h2
X2: Top Overlay "ZIF / HVQFN20 TO PD-24 / STEP 0.65mm / WITH EP TO GND" at 146.93,67.75 h0.6 r270
X4: Top Overlay "ZIF / HVQFN20 TO PD-24" at 22.525,40.225 h0.6